# Altium PCB Sampler.PCBDOC (part 2 of 11)
Units mm, origin at the board's own origin, x right, y up, seen from the top; angles counter-clockwise.
Board outline 222.9 x 100 mm, 4 copper layers (L1, P2, L3, L4), stack 1.6 mm thick; 754 components, 442 nets, 2347 pads, 1230 vias.
Unrouted connection lines stored in the file: 10.
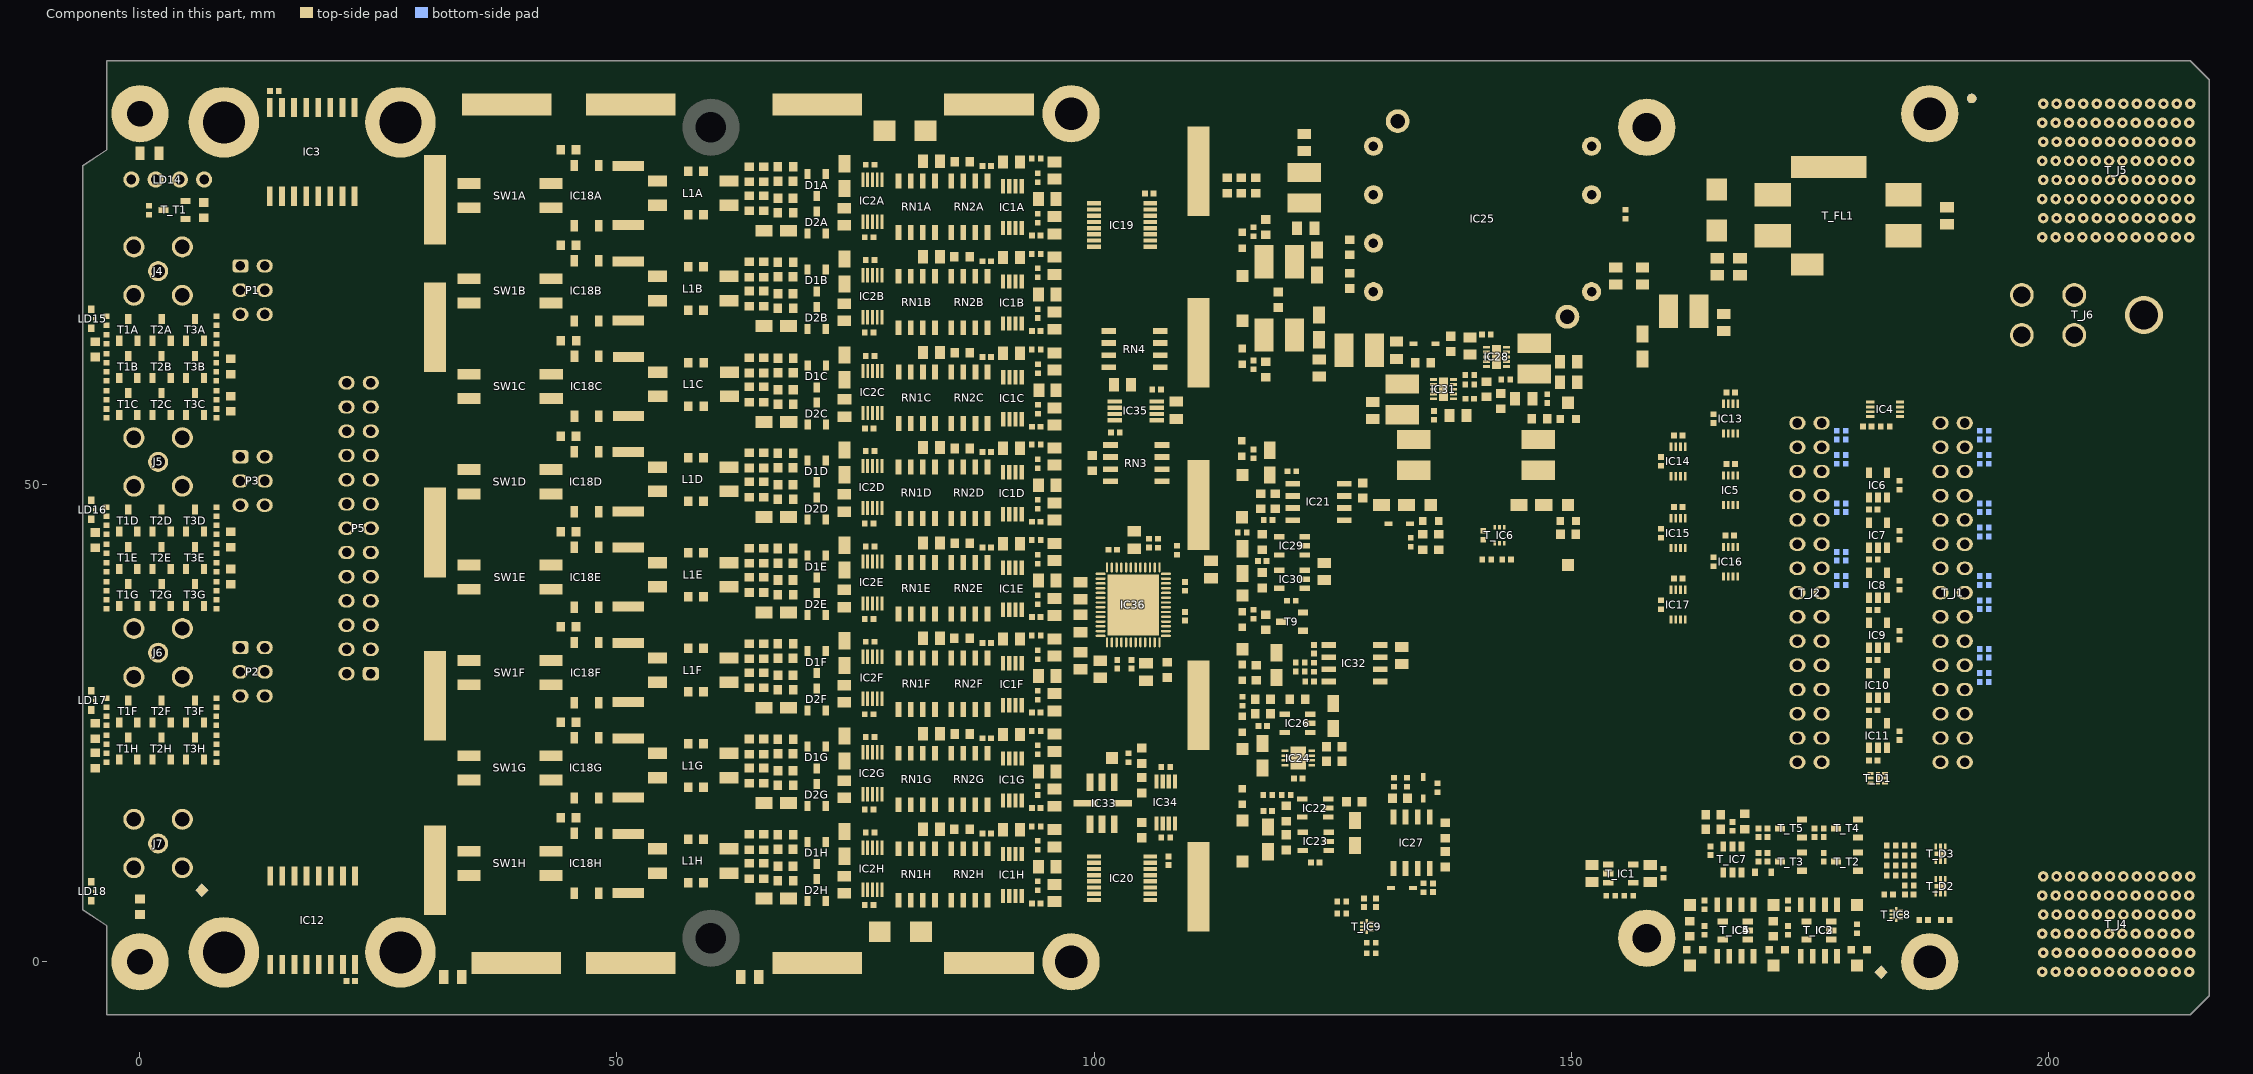
[diagram p4: the components of this part, seen from the top]

## Components (designator, comment, footprint, x,y, rotation, side; value= is the part's Value field where it differs from the comment) (continued)
IC18C "TLP170AM" TOSHIBA_11-4M1S 46.813,60.32 r270 top (schematic designator IC18)
IC18D "TLP170AM" TOSHIBA_11-4M1S 46.8,50.32 r270 top (schematic designator IC18)
IC18E "TLP170AM" TOSHIBA_11-4M1S 46.8,40.32 r270 top (schematic designator IC18)
IC18F "TLP170AM" TOSHIBA_11-4M1S 46.8,30.32 r270 top (schematic designator IC18)
IC18G "TLP170AM" TOSHIBA_11-4M1S 46.8,20.32 r270 top (schematic designator IC18)
IC18H "TLP170AM" TOSHIBA_11-4M1S 46.8,10.32 r270 top (schematic designator IC18)
IC19 "SN74LV595APWR" SOP65P640X120-16N 102.949,77.225 r0 top
IC20 "SN74LV595APWR" SOP65P640X120-16N 102.949,8.762 r0 top
IC21 "LT1763CS8#PBF" SOIC127P600X175-8N 123.534,48.203 r0 top
IC22 "LT1761ES5-SD#TRMPBF" SOT95P280X100-5N 123.194,16.119 r180 top
IC23 "LT1761ES5-BYP#TRMPBF" SOT95P280X100-5N 123.244,12.619 r180 top
IC24 "LT1964EDD#PBF" LT-DD-8_V 121.412,21.36 r0 top
IC25 "CC6-1212DF-E" CC6-1212DF-E 149.614,67.615 r180 top
IC26 "LT1964ES5-SD#TRMPBF" SOT95P280X100-5N 121.337,24.997 r180 top
IC27 "LM393AD" SOIC127P600X175-8N 133.286,12.492 r270 top
IC28 "TPS62175DQC" SON50P200X300X80-11N-R94X250 142.192,63.415 r0 top
IC29 "LT1761ES5-SD#TRMPBF" SOT95P280X100-5N 120.75,43.6 r180 top
IC30 "LT1761ES5-BYP#TRMPBF" SOT95P280X100-5N 120.75,40.1 r180 top
IC31 "TPS62175DQC" SON50P200X300X80-11N-R94X250 136.641,60.02 r180 top
IC32 "LT1763CS8#PBF" SOIC127P600X175-8N 127.296,31.294 r0 top
IC33 "LTC6655CHLS8-4.096" LCCS127P500X500X145-8N 100.844,16.634 r90 top
IC34 "LTC6655BHMS8-4.096#PBF" SOP65P490X110-8N 107.519,16.705 r90 top
IC35 "OPA2197IDGKR" SOP65P490X110-8N 104.375,57.75 r0 top
IC36 "LTC2320HUKG-16#PBF" QFN50P700X800X80_HS-53M 104.114,37.415 r0 top
J4 "SMA" DELOCK_65848 1.9,72.4 r180 top locked
J5 "SMA" DELOCK_65848 1.9,52.4 r180 top locked
J6 "SMA" DELOCK_65848 1.9,32.4 r180 top locked
J7 "SMA" DELOCK_65848 1.9,12.4 r180 top locked
L1A "2x6.5mH" IND_WURTH_WE-SL2 58.01,80.574 r0 top (schematic designator L1)
L1B "2x6.5mH" IND_WURTH_WE-SL2 58.01,70.574 r0 top (schematic designator L1)
L1C "2x6.5mH" IND_WURTH_WE-SL2 58.023,60.53 r0 top (schematic designator L1)
L1D "2x6.5mH" IND_WURTH_WE-SL2 58.01,50.574 r0 top (schematic designator L1)
L1E "2x6.5mH" IND_WURTH_WE-SL2 58.01,40.574 r0 top (schematic designator L1)
L1F "2x6.5mH" IND_WURTH_WE-SL2 58.01,30.574 r0 top (schematic designator L1)
L1G "2x6.5mH" IND_WURTH_WE-SL2 58.01,20.574 r0 top (schematic designator L1)
L1H "2x6.5mH" IND_WURTH_WE-SL2 58.01,10.574 r0 top (schematic designator L1)
L2 "10uH" IND_MURATA-PS_8400 122.044,81.13 r270 top
L3 "10uH" IND_MURATA-PS_8400 119.4,73.4 r180 top
L4 "10uH" IND_MURATA-PS_8400 161.8,68.2 r180 top
L5 "10uH" IND_MURATA-PS_8400 127.8,64.1 r180 top
L6 "10uH" IND_MURATA-PS_8400 119.4,65.7 r180 top
L7 "10uH" IND_MURATA-PS_8400 146.165,63.235 r270 top
L8 "10uH" IND_MURATA-PS_8400 146.571,53.129 r270 top
L9 "10uH" IND_MURATA-PS_8400 132.313,58.945 r270 top
L10 "10uH" IND_MURATA-PS_8400 133.5,53.129 r270 top
LD1 "Green" LED_KINGBRIGHT_KPH-1608CGCK 115.55,75.64 r90 top
LD2 "Green" LED_KINGBRIGHT_KPH-1608CGCK 180.2,1.271 r180 top
LD3 "Green" LED_KINGBRIGHT_KPH-1608CGCK 115.5,53.8 r270 top
LD4 "Green" LED_KINGBRIGHT_KPH-1608CGCK 115.55,17.325 r270 top
LD5 "Green" LED_KINGBRIGHT_KPH-1608CGCK 135.3,46.2 r0 top
LD6 "Green" LED_KINGBRIGHT_KPH-1608CGCK 115.55,30.338 r90 top
LD7 "Green" LED_KINGBRIGHT_KPH-1608CGCK 149.7,56.897 r180 top
LD8 "Green" LED_KINGBRIGHT_KPH-1608CGCK 149.7,46.2 r0 top
LD9 "Green" LED_KINGBRIGHT_KPH-1608CGCK 171.6,1.271 r180 top
LD10 "Green" LED_KINGBRIGHT_KPH-1608CGCK 162.975,1.271 r180 top
LD11 "Green" LED_KINGBRIGHT_KPH-1608CGCK 115.55,35.875 r90 top
LD12 "Green" LED_KINGBRIGHT_KPH-1608CGCK 115.55,24.9 r90 top
LD13 "Green" LED_KINGBRIGHT_KPH-1608CGCK 115.55,63.46 r270 top
LD14 "Red/Green" LED_DIALIGHT_571-0112F -0.9,82 r0 top locked
LD15 "Green" LED_AVAGO_HSME-C120 -5.1,67.4 r90 top locked
LD16 "Green" LED_AVAGO_HSME-C120 -5.1,47.4 r90 top locked
LD17 "Green" LED_AVAGO_HSME-C120 -5.1,27.4 r90 top locked
LD18 "Green" LED_AVAGO_HSME-C120 -5.1,7.4 r90 top locked
M1 "Plated Hole" MTG300_600 157.944,2.48 r0 top
M2 "Plated Hole" MTG300_600 157.944,87.48 r180 top
P1 "61300621121" 61300621121 11.8,70.4 r270 top locked
P2 "61300621121" 61300621121 11.8,30.4 r270 top locked
P3 "61300621121" 61300621121 11.8,50.4 r270 top locked
P5 "61302621121" 61302621121 22.93,45.45 r90 top locked
R1A "Undefined" RESC1608X55N 58.264,82.86 r0 top (schematic designator R1)
R1B "Undefined" RESC1608X55N 58.264,72.86 r0 top (schematic designator R1)
R1C "Undefined" RESC1608X55N 58.277,62.816 r0 top (schematic designator R1)
R1D "Undefined" RESC1608X55N 58.264,52.86 r0 top (schematic designator R1)
R1E "Undefined" RESC1608X55N 58.264,42.86 r0 top (schematic designator R1)
R1F "Undefined" RESC1608X55N 58.264,32.86 r0 top (schematic designator R1)
R1G "Undefined" RESC1608X55N 58.264,22.86 r0 top (schematic designator R1)
R1H "Undefined" RESC1608X55N 58.264,12.86 r0 top (schematic designator R1)
R2A "0" RESC1608X55N 63.852,82.56 r90 top (schematic designator R2)
R2B "0" RESC1608X55N 63.852,72.56 r90 top (schematic designator R2)
R2C "0" RESC1608X55N 63.865,62.516 r90 top (schematic designator R2)
R2D "0" RESC1608X55N 63.852,52.56 r90 top (schematic designator R2)
R2E "0" RESC1608X55N 63.852,42.56 r90 top (schematic designator R2)
R2F "0" RESC1608X55N 63.852,32.56 r90 top (schematic designator R2)
R2G "0" RESC1608X55N 63.852,22.56 r90 top (schematic designator R2)
R2H "0" RESC1608X55N 63.852,12.56 r90 top (schematic designator R2)
R3A "1k8" RESC1608X55N 67.662,83.322 r0 top (schematic designator R3)
R3B "1k8" RESC1608X55N 67.662,73.322 r0 top (schematic designator R3)
R3C "1k8" RESC1608X55N 67.675,63.278 r0 top (schematic designator R3)
R3D "1k8" RESC1608X55N 67.662,53.322 r0 top (schematic designator R3)
R3E "1k8" RESC1608X55N 67.662,43.322 r0 top (schematic designator R3)
R3F "1k8" RESC1608X55N 67.662,33.322 r0 top (schematic designator R3)
R3G "1k8" RESC1608X55N 67.662,23.322 r0 top (schematic designator R3)
R3H "1k8" RESC1608X55N 67.662,13.322 r0 top (schematic designator R3)
R4A "100k" RESC1608X55N 65.376,82.56 r90 top (schematic designator R4)
R4B "100k" RESC1608X55N 65.376,72.56 r90 top (schematic designator R4)
R4C "100k" RESC1608X55N 65.389,62.516 r90 top (schematic designator R4)
R4D "100k" RESC1608X55N 65.376,52.56 r90 top (schematic designator R4)
R4E "100k" RESC1608X55N 65.376,42.56 r90 top (schematic designator R4)
R4F "100k" RESC1608X55N 65.376,32.56 r90 top (schematic designator R4)
R4G "100k" RESC1608X55N 65.376,22.56 r90 top (schematic designator R4)
R4H "100k" RESC1608X55N 65.376,12.56 r90 top (schematic designator R4)
R5A "49R9" RESC6331X70N 51.194,80.32 r90 top (schematic designator R5)
R5B "49R9" RESC6331X70N 51.194,70.32 r90 top (schematic designator R5)
R5C "49R9" RESC6331X70N 51.207,60.32 r90 top (schematic designator R5)
R5D "49R9" RESC6331X70N 51.194,50.32 r90 top (schematic designator R5)
R5E "49R9" RESC6331X70N 51.194,40.32 r90 top (schematic designator R5)
R5F "49R9" RESC6331X70N 51.194,30.32 r90 top (schematic designator R5)
R5G "49R9" RESC6331X70N 51.194,20.32 r90 top (schematic designator R5)
R5H "49R9" RESC6331X70N 51.194,10.32 r90 top (schematic designator R5)
R6A "51" RESC1005X40N 94.103,77.956 r90 top (schematic designator R6)
R6B "51" RESC1005X40N 94.103,67.956 r90 top (schematic designator R6)
R6C "51" RESC1005X40N 94.116,57.912 r90 top (schematic designator R6)
R6D "51" RESC1005X40N 94.103,47.956 r90 top (schematic designator R6)
R6E "51" RESC1005X40N 94.103,37.956 r90 top (schematic designator R6)
R6F "51" RESC1005X40N 94.103,27.956 r90 top (schematic designator R6)
R6G "51" RESC1005X40N 94.103,17.956 r90 top (schematic designator R6)
R6H "51" RESC1005X40N 94.103,7.956 r90 top (schematic designator R6)
R7A "24k" RESC1608X55N 86.194,83.88 r180 top (schematic designator R7)
R7B "24k" RESC1608X55N 86.169,73.905 r180 top (schematic designator R7)
R7C "24k" RESC1608X55N 86.194,63.855 r180 top (schematic designator R7)
R7D "24k" RESC1608X55N 86.194,53.805 r180 top (schematic designator R7)
R7E "24k" RESC1608X55N 86.194,43.88 r180 top (schematic designator R7)
R7F "24k" RESC1608X55N 86.169,33.905 r180 top (schematic designator R7)
R7G "24k" RESC1608X55N 86.194,23.88 r180 top (schematic designator R7)
R7H "24k" RESC1608X55N 86.169,13.88 r180 top (schematic designator R7)
R8A "Undefined" RESC1608X55N 58.264,78.288 r0 top (schematic designator R8)
R8B "Undefined" RESC1608X55N 58.264,68.288 r0 top (schematic designator R8)
R8C "Undefined" RESC1608X55N 58.277,58.244 r0 top (schematic designator R8)
R8D "Undefined" RESC1608X55N 58.264,48.288 r0 top (schematic designator R8)
R8E "Undefined" RESC1608X55N 58.264,38.288 r0 top (schematic designator R8)
R8F "Undefined" RESC1608X55N 58.264,28.288 r0 top (schematic designator R8)
R8G "Undefined" RESC1608X55N 58.264,18.288 r0 top (schematic designator R8)
R8H "Undefined" RESC1608X55N 58.264,8.288 r0 top (schematic designator R8)
R9A "0" RESC1608X55N 63.852,79.512 r270 top (schematic designator R9)
R9B "0" RESC1608X55N 63.852,69.512 r270 top (schematic designator R9)
R9C "0" RESC1608X55N 63.865,59.468 r270 top (schematic designator R9)
R9D "0" RESC1608X55N 63.852,49.512 r270 top (schematic designator R9)
R9E "0" RESC1608X55N 63.852,39.512 r270 top (schematic designator R9)
R9F "0" RESC1608X55N 63.852,29.512 r270 top (schematic designator R9)
R9G "0" RESC1608X55N 63.852,19.512 r270 top (schematic designator R9)
R9H "0" RESC1608X55N 63.852,9.512 r270 top (schematic designator R9)
R10A "1k8" RESC1608X55N 67.662,78.496 r0 top (schematic designator R10)
R10B "1k8" RESC1608X55N 67.662,68.496 r0 top (schematic designator R10)
R10C "1k8" RESC1608X55N 67.675,58.452 r0 top (schematic designator R10)
R10D "1k8" RESC1608X55N 67.662,48.496 r0 top (schematic designator R10)
R10E "1k8" RESC1608X55N 67.662,38.496 r0 top (schematic designator R10)
R10F "1k8" RESC1608X55N 67.662,28.496 r0 top (schematic designator R10)
R10G "1k8" RESC1608X55N 67.662,18.496 r0 top (schematic designator R10)
R10H "1k8" RESC1608X55N 67.662,8.496 r0 top (schematic designator R10)
R11A "100k" RESC1608X55N 65.376,79.512 r270 top (schematic designator R11)
R11B "100k" RESC1608X55N 65.376,69.512 r270 top (schematic designator R11)
R11C "100k" RESC1608X55N 65.389,59.468 r270 top (schematic designator R11)
R11D "100k" RESC1608X55N 65.376,49.512 r270 top (schematic designator R11)
R11E "100k" RESC1608X55N 65.376,39.512 r270 top (schematic designator R11)
R11F "100k" RESC1608X55N 65.376,29.512 r270 top (schematic designator R11)
R11G "100k" RESC1608X55N 65.376,19.512 r270 top (schematic designator R11)
R11H "100k" RESC1608X55N 65.376,9.512 r270 top (schematic designator R11)
R12A "51" RESC1005X40N 94.103,82.206 r270 top (schematic designator R12)
R12B "51" RESC1005X40N 94.103,72.206 r270 top (schematic designator R12)
R12C "51" RESC1005X40N 94.116,62.162 r270 top (schematic designator R12)
R12D "51" RESC1005X40N 94.103,52.206 r270 top (schematic designator R12)
R12E "51" RESC1005X40N 94.103,42.206 r270 top (schematic designator R12)
R12F "51" RESC1005X40N 94.103,32.206 r270 top (schematic designator R12)
R12G "51" RESC1005X40N 94.103,22.206 r270 top (schematic designator R12)
R12H "51" RESC1005X40N 94.103,12.206 r270 top (schematic designator R12)
R13A "2k4" RESC1005X40N 93.944,84.205 r180 top (schematic designator R13)
R13B "2k4" RESC1005X40N 93.944,74.205 r180 top (schematic designator R13)
R13C "2k4" RESC1005X40N 93.957,64.161 r180 top (schematic designator R13)
R13D "2k4" RESC1005X40N 93.944,54.205 r180 top (schematic designator R13)
R13E "2k4" RESC1005X40N 93.944,44.205 r180 top (schematic designator R13)
R13F "2k4" RESC1005X40N 93.944,34.205 r180 top (schematic designator R13)
R13G "2k4" RESC1005X40N 93.944,24.205 r180 top (schematic designator R13)
R13H "2k4" RESC1005X40N 93.944,14.205 r180 top (schematic designator R13)
R14 "100" RESC1005X40N 182.917,56.114 r180 top
R15 "100" RESC1005X40N 184.427,49.97 r270 top
R16 "100" RESC1005X40N 184.427,44.72 r270 top
R17 "100" RESC1005X40N 184.427,39.47 r270 top
R18 "100" RESC1005X40N 184.427,34.22 r270 top
R19 "100" RESC1005X40N 184.427,23.72 r270 top
R20 "100" RESC1005X40N 164.938,56.948 r90 top
R21 "100" RESC1005X40N 159.427,52.444 r90 top
R22 "100" RESC1005X40N 159.427,44.944 r90 top
R23 "100" RESC1005X40N 164.927,41.945 r90 top
R24 "100" RESC1005X40N 159.427,37.445 r90 top
R25A "1k2" RESC1608X55N 44.9,85.1 r180 top (schematic designator R25)
R25B "1k2" RESC1608X55N 44.9,75.1 r180 top (schematic designator R25)
R25C "1k2" RESC1608X55N 44.913,65.1 r180 top (schematic designator R25)
R25D "1k2" RESC1608X55N 44.9,55.1 r180 top (schematic designator R25)
R25E "1k2" RESC1608X55N 44.9,45.1 r180 top (schematic designator R25)
R25F "1k2" RESC1608X55N 44.9,35.1 r180 top (schematic designator R25)
R25G "1k2" RESC1608X55N 44.9,25.1 r180 top (schematic designator R25)
R25H "1k2" RESC1608X55N 44.9,15.1 r180 top (schematic designator R25)
R26 "1k2" RESC1608X55N 9.5,62.4 r90 top
R27A "10k" RESC1005X40N -3.5,67.175 r270 top (schematic designator R27)
R27B "10k" RESC1005X40N -3.5,63.275 r270 top (schematic designator R27)
R27C "10k" RESC1005X40N -3.497,59.375 r270 top (schematic designator R27)
R27D "10k" RESC1005X40N -3.5,47.175 r270 top (schematic designator R27)
R27E "10k" RESC1005X40N -3.5,43.275 r270 top (schematic designator R27)
R27F "10k" RESC1005X40N -3.5,27.175 r270 top (schematic designator R27)
R27G "10k" RESC1005X40N -3.5,39.375 r270 top (schematic designator R27)
R27H "10k" RESC1005X40N -3.497,23.275 r270 top (schematic designator R27)
R28 "1k2" RESC1608X55N -4.7,64.2 r270 top
R29A "10k" RESC1005X40N -3.5,65.275 r90 top (schematic designator R29)
R29B "10k" RESC1005X40N -3.5,61.375 r90 top (schematic designator R29)
R29C "10k" RESC1005X40N -3.5,57.475 r90 top (schematic designator R29)
R29D "10k" RESC1005X40N -3.5,45.275 r90 top (schematic designator R29)
R29E "10k" RESC1005X40N -3.5,41.375 r90 top (schematic designator R29)
R29F "10k" RESC1005X40N -3.5,25.275 r90 top (schematic designator R29)
R29G "10k" RESC1005X40N -3.5,37.475 r90 top (schematic designator R29)
R29H "10k" RESC1005X40N -3.5,21.375 r90 top (schematic designator R29)
R30 "1k2" RESC1608X55N 9.5,58.5 r90 top
R31A "10k" RESC1005X40N 8,65.275 r270 top (schematic designator R31)
R31B "10k" RESC1005X40N 7.997,61.375 r270 top (schematic designator R31)
R31C "10k" RESC1005X40N 8,57.475 r270 top (schematic designator R31)
R31D "10k" RESC1005X40N 8,45.275 r270 top (schematic designator R31)
R31E "10k" RESC1005X40N 8,41.375 r270 top (schematic designator R31)
R31F "10k" RESC1005X40N 7.997,25.275 r270 top (schematic designator R31)
R31G "10k" RESC1005X40N 8,37.475 r270 top (schematic designator R31)
R31H "10k" RESC1005X40N 8,21.375 r270 top (schematic designator R31)
R32 "1k2" RESC1608X55N -4.7,44.2 r270 top
R33A "10k" RESC1005X40N 8,67.175 r270 top (schematic designator R33)
R33B "10k" RESC1005X40N 7.997,63.275 r270 top (schematic designator R33)
R33C "10k" RESC1005X40N 8,59.375 r270 top (schematic designator R33)
R33D "10k" RESC1005X40N 8,47.175 r270 top (schematic designator R33)
R33E "10k" RESC1005X40N 8,43.275 r270 top (schematic designator R33)
R33F "10k" RESC1005X40N 8,27.175 r270 top (schematic designator R33)
R33G "10k" RESC1005X40N 8,39.375 r270 top (schematic designator R33)
R33H "10k" RESC1005X40N 8,23.275 r270 top (schematic designator R33)
R34 "1k2" RESC1608X55N 9.5,44.272 r270 top
R35 "10k" RESC1005X40N 121.63,30.424 r0 top
R37 "1k2" RESC1608X55N -4.7,24.2 r270 top
R38 "1k2" RESC1608X55N 9.5,40.372 r270 top
R40 "1k2" RESC1608X55N -4.7,21.1 r90 top
R41 "Undefined" RESC1608X55N 113.944,81.38 r270 top
R42 "Undefined" RESC1608X55N 116.944,81.38 r270 top
R45 "10k" RESC1005X40N 116.721,76.54 r90 top
R46 "1k2" RESC1608X55N 118,77.01 r270 top
R47 "10k" RESC1005X40N 179.977,3.471 r90 top
R48 "10k" RESC1005X40N 116.7,53.23 r270 top
R49 "5k1" RESC1005X40N 118.2,17.5 r0 top
R50 "2k7" RESC1608X55N 136.125,44 r270 top
R51 "24k" RESC1608X55N 117.493,48.269 r270 top
R52 "2k7" RESC1608X55N 118.993,48.269 r90 top
R53 "2k7" RESC1608X55N 121.337,27.5 r0 top
R54 "24k" RESC1608X55N 120.144,15.55 r270 top
R55 "5k1" RESC1005X40N 120.144,17.5 r0 top
R56 "Undefined" RESC1608X55N 126.813,71.38 r270 top
R57 "0" RESC1005X40N 155.694,78.38 r90 top
R58 "36k" RESC1608X55N 126.813,74.899 r270 top
R59 "10k" RESC1005X40N 131.425,18.82 r90 top
R60 "2k4" RESC1005X40N 136.011,18.242 r90 top
R61 "24k" RESC1608X55N 117.7,26.025 r180 top
R62 "62k" RESC1005X40N 132.825,18.82 r270 top
R63 "2k7" RESC1608X55N 117.7,27.5 r0 top
R64 "24k" RESC1608X55N 134.491,62.795 r180 top
R65 "5k1" RESC1005X40N 134.536,7.742 r270 top
R66 "270k" RESC1608X55N 142.641,58.77 r270 top
R67 "24k" RESC1608X55N 136.825,13.767 r90 top
R68 "82k" RESC1608X55N 141.141,60.02 r90 top
R69 "5k1" RESC1005X40N 143.141,61.02 r180 top
R70 "36k" RESC1608X55N 117.65,44 r270 top
R71 "33k" RESC1005X40N 115.55,45 r0 top
R72 "33k" RESC1005X40N 139.391,60.52 r0 top
R73 "62k" RESC1005X40N 121.63,31.364 r180 top
R74 "5k1" RESC1005X40N 139.391,61.52 r180 top
R75 "10k" RESC1005X40N 123.046,30.894 r90 top
R76 "1k" RESC1608X55N 118,35.6 r270 top
R77 "82k" RESC1608X55N 107.694,30.605 r90 top
R78 "0" RESC1005X40N 106.687,43.891 r90 top
R79 "100" RESC1005X40N 108.694,43.13 r270 top
R80 "0" RESC1005X40N 107.521,13.013 r180 top
R81 "0" RESC1005X40N 103.6,21.4 r90 top
R82 "0" RESC1005X40N 107.521,20.409 r180 top
R83 "24k" RESC1608X55N 99.8,52.275 r270 top
R84 "1k2" RESC1608X55N 134.475,44 r90 top
R85 "2k7" RESC1608X55N 117,30.3 r90 top
R86 "Undefined" RESC1608X55N 115.444,81.38 r270 top
R87 "1k2" RESC1608X55N 146.7,56.9 r180 top
R88 "1k2" RESC1608X55N 149.7,44.8 r180 top
R89 "1k2" RESC1608X55N 171.221,3.471 r90 top
R90 "1k2" RESC1608X55N 162.465,3.471 r90 top
R91 "470" RESC1005X40N 116.7,36.42 r270 top
R92 "10k" RESC1005X40N 115.55,27.3 r90 top
R93 "10k" RESC1005X40N 116.721,62.56 r270 top
R94 "1k2" RESC1608X55N 118,62.09 r90 top
R157 "0" RESC1005X40N 133.2,43.97 r270 top
RN1A "10k 5K 5K 10K" SOIC127P600X175-8N 81.423,79.157 r90 top (schematic designator RN1)
RN1B "10k 5K 5K 10K" SOIC127P600X175-8N 81.423,69.157 r90 top (schematic designator RN1)
RN1C "10k 5K 5K 10K" SOIC127P600X175-8N 81.436,59.113 r90 top (schematic designator RN1)
RN1D "10k 5K 5K 10K" SOIC127P600X175-8N 81.423,49.157 r90 top (schematic designator RN1)
RN1E "10k 5K 5K 10K" SOIC127P600X175-8N 81.423,39.157 r90 top (schematic designator RN1)
RN1F "10k 5K 5K 10K" SOIC127P600X175-8N 81.423,29.157 r90 top (schematic designator RN1)
RN1G "10k 5K 5K 10K" SOIC127P600X175-8N 81.423,19.157 r90 top (schematic designator RN1)
RN1H "10k 5K 5K 10K" SOIC127P600X175-8N 81.423,9.157 r90 top (schematic designator RN1)
RN2A "10k 5K 5K 10K" SOIC127P600X175-8N 86.929,79.155 r270 top (schematic designator RN2)
RN2B "10k 5K 5K 10K" SOIC127P600X175-8N 86.929,69.155 r270 top (schematic designator RN2)
RN2C "10k 5K 5K 10K" SOIC127P600X175-8N 86.942,59.112 r270 top (schematic designator RN2)
RN2D "10k 5K 5K 10K" SOIC127P600X175-8N 86.929,49.155 r270 top (schematic designator RN2)
RN2E "10k 5K 5K 10K" SOIC127P600X175-8N 86.929,39.155 r270 top (schematic designator RN2)
RN2F "10k 5K 5K 10K" SOIC127P600X175-8N 86.929,29.155 r270 top (schematic designator RN2)
RN2G "10k 5K 5K 10K" SOIC127P600X175-8N 86.929,19.155 r270 top (schematic designator RN2)
RN2H "10k 5K 5K 10K" SOIC127P600X175-8N 86.929,9.155 r270 top (schematic designator RN2)
RN3 "10k 5K 5K 10K" SOIC127P600X175-8N 104.425,52.275 r0 top
RN4 "10k 5K 5K 10K" SOIC127P600X175-8N 104.25,64.225 r0 top
ST1 "M3 x 12mm" 9774120360 8.8,1 r0 top locked
ST2 "M3 x 12mm" 9774120360 8.8,88 r0 top locked
ST3 "M3 x 12mm" 9774120360 27.3,1 r0 top locked
ST4 "M3 x 12mm" 9774120360 27.3,88 r0 top locked
SW1A "Switch" SW_CTS_204-121ST 38.786,80.32 r0 top (schematic designator SW1)
SW1B "Switch" SW_CTS_204-121ST 38.786,70.32 r0 top (schematic designator SW1)
SW1C "Switch" SW_CTS_204-121ST 38.799,60.32 r0 top (schematic designator SW1)
SW1D "Switch" SW_CTS_204-121ST 38.786,50.32 r0 top (schematic designator SW1)
SW1E "Switch" SW_CTS_204-121ST 38.786,40.32 r0 top (schematic designator SW1)
SW1F "Switch" SW_CTS_204-121ST 38.786,30.32 r0 top (schematic designator SW1)
SW1G "Switch" SW_CTS_204-121ST 38.786,20.32 r0 top (schematic designator SW1)
SW1H "Switch" SW_CTS_204-121ST 38.786,10.32 r0 top (schematic designator SW1)
T1A "BSS138LT1G" SOT95P240X110-3N -1.225,66.25 r90 top (schematic designator T1)
T1B "BSS138LT1G" SOT95P240X110-3N -1.233,62.35 r90 top (schematic designator T1)
T1C "BSS138LT1G" SOT95P240X110-3N -1.23,58.45 r90 top (schematic designator T1)
T1D "BSS138LT1G" SOT95P240X110-3N -1.233,46.25 r90 top (schematic designator T1)
T1E "BSS138LT1G" SOT95P240X110-3N -1.23,42.35 r90 top (schematic designator T1)
T1F "BSS138LT1G" SOT95P240X110-3N -1.233,26.25 r90 top (schematic designator T1)
T1G "BSS138LT1G" SOT95P240X110-3N -1.225,38.45 r90 top (schematic designator T1)
T1H "BSS138LT1G" SOT95P240X110-3N -1.23,22.35 r90 top (schematic designator T1)
T2A "BSS138LT1G" SOT95P240X110-3N 2.275,66.25 r90 top (schematic designator T2)
T2B "BSS138LT1G" SOT95P240X110-3N 2.267,62.35 r90 top (schematic designator T2)
T2C "BSS138LT1G" SOT95P240X110-3N 2.27,58.45 r90 top (schematic designator T2)
T2D "BSS138LT1G" SOT95P240X110-3N 2.267,46.25 r90 top (schematic designator T2)
T2E "BSS138LT1G" SOT95P240X110-3N 2.27,42.35 r90 top (schematic designator T2)
T2F "BSS138LT1G" SOT95P240X110-3N 2.267,26.25 r90 top (schematic designator T2)
T2G "BSS138LT1G" SOT95P240X110-3N 2.275,38.45 r90 top (schematic designator T2)
T2H "BSS138LT1G" SOT95P240X110-3N 2.27,22.35 r90 top (schematic designator T2)
T3A "BSS138LT1G" SOT95P240X110-3N 5.775,66.25 r90 top (schematic designator T3)
T3B "BSS138LT1G" SOT95P240X110-3N 5.767,62.35 r90 top (schematic designator T3)
T3C "BSS138LT1G" SOT95P240X110-3N 5.77,58.45 r90 top (schematic designator T3)
T3D "BSS138LT1G" SOT95P240X110-3N 5.767,46.25 r90 top (schematic designator T3)
T3E "BSS138LT1G" SOT95P240X110-3N 5.77,42.35 r90 top (schematic designator T3)
T3F "BSS138LT1G" SOT95P240X110-3N 5.767,26.25 r90 top (schematic designator T3)
T3G "BSS138LT1G" SOT95P240X110-3N 5.775,38.45 r90 top (schematic designator T3)
T3H "BSS138LT1G" SOT95P240X110-3N 5.77,22.35 r90 top (schematic designator T3)
T9 "BSS138LT1G" SOT95P240X110-3N 120.75,35.65 r180 top
T_B1 "Plated Hole" c600h270 0,0 r0 top
T_B2 "Plated Hole" c600h270 0,88.9 r0 top locked
T_C1 "4.7uF" CAPC2012X135N 152.2,9.25 r90 top
T_C2 "4.7uF" CAPC2012X135N 158.3,9.25 r90 top
T_C3 "100nF" CAPC1005X55N 172.753,3.284 r90 top
T_C4 "100nF" CAPC1005X55N 172.753,5.963 r270 top
T_C5 "100nF" CAPC1005X55N 163.997,3.284 r90 top
T_C6 "100nF" CAPC1005X55N 163.997,5.963 r270 top
T_C8 "100nF" CAPC1005X55N 143.24,42.184 r180 top
T_C9 "10uF" CAPC2012X95N 167.73,72.85 r90 top
T_C10 "10uF" CAPC2012X95N 165.33,72.85 r90 top
T_C11 "10uF" CAPC2012X95N 189.4,78.2 r270 top
T_C12 "18pF" CAPC1608X87N 0,5.775 r270 top
T_C13 "10nF" CAPC1005X55N 166.919,14.186 r90 top
T_C14 "100nF" CAPC1005X55N 175.542,13.527 r270 top
T_C15 "100nF" CAPC1005X55N 170.609,13.527 r270 top
T_C16 "10nF" CAPC1005X55N 169.658,13.527 r270 top
T_C17 "10nF" CAPC1005X55N 176.493,10.95 r90 top
T_C18 "10nF" CAPC1005X55N 169.658,10.95 r90 top
T_C19 "10nF" CAPC1005X55N 170.609,10.95 r90 top
T_C20 "100nF" CAPC1005X55N 164.62,11.636 r90 top
T_C21 "100nF" CAPC1005X55N 176.493,13.527 r90 top
T_C22 "100nF" CAPC1005X55N 183.28,7.042 r0 top
T_C23 "100nF" CAPC1005X55N 185.45,7.042 r180 top
T_C24 "100nF" CAPC1005X55N 129.55,6.196 r270 top
T_C25 "100nF" CAPC1005X55N 128.3,6.196 r270 top
T_D1 "UCLAMP3305P.TCT" SON50P160X65_HS-7N 182.177,19.25 r180 top
T_D2 "UCLAMP3305P.TCT" SON50P160X65_HS-7N 188.731,7.933 r90 top
T_D3 "UCLAMP3305P.TCT" SON50P160X65_HS-7N 188.731,11.332 r90 top
T_D5 "SMBJ12A" DIOM5336X265N 165.3,78.8 r90 top
T_D6 "CDBU0520-HF" SOD-523F 170.126,9.391 r180 top
T_FL1 "10A/50VDC" FIL_MURATA_BNX02 178,78.2 r180 top
T_IC1 "MIC5219-3.3YM5" SOT95P280X145-5N 155.225,9.25 r0 top
T_IC2 "24AA02E48T-I/OT" SOT95P280X145-5N 175.983,3.284 r180 top
T_IC3 "24AA025E48-I/SN" SOIC127P600X175-8N 175.983,3.284 r90 top
T_IC4 "24AA02E48T-I/OT" SOT95P280X145-5N 167.228,3.284 r180 top
T_IC5 "24AA025E48-I/SN" SOIC127P600X175-8N 167.228,3.284 r90 top
T_IC6 "TMP112DQDRLRQ1" SOTFL50P160X60-6N 142.5,44.7 r270 top
T_IC7 "TPS3808G01DBVT" SOT95P280X145-6N 166.919,10.736 r90 top
T_IC8 "FXMA2102UMX" FXMA2102UMX 184.091,4.958 r270 top
T_IC9 "FXMA2102UMX" FXMA2102UMX 128.6,3.7 r270 top
T_J1 "" 3M_N2530-6002RB 190,38.7 r270 top locked
T_J2 "" 3M_N2530-6002RB 175,38.7 r270 top locked
T_J4 "P1" AMPHENOL_10052825-101LF 207.15,3.95 r90 top locked
T_J5 "P6" AMPHENOL_10052838-101LF 207.15,82.95 r90 top locked
T_J6 "Mini-Fit Jr.™" MOLEX_39-30-0040 200,67.8 r270 top
T_M1 "PTH_3.4X6_BTKO" PTH-M3.4x6.0_BTKO 97.6,88.9 r180 top locked
T_M2 "PTH_3.4X6_BTKO" PTH-M3.4x6.0_BTKO 187.6,88.9 r180 top
T_M3 "PTH_3.4X6_BTKO" PTH-M3.4x6.0_BTKO 97.6,0 r0 top locked
T_M4 "PTH_3.4X6_BTKO" PTH-M3.4x6.0_BTKO 187.6,0 r0 top locked
T_R1 "1k8" RESC1608X55N 6.675,78.794 r270 top
T_R2 "0" RESC1005X40N 159.7,9.277 r270 top
T_R3 "10k" RESC1005X40N 0.925,78.794 r270 top
T_R4 "10k" RESC1005X40N 156.05,6.925 r180 top
T_R5 "10k" RESC1005X40N 129.05,0.9 r0 top
T_R6 "10k" RESC1005X40N 129.05,2 r0 top
T_R7 "3k9" RESC1005X40N 154.15,6.925 r0 top
T_R8 "10k" RESC1005X40N 140.8,44.7 r270 top
T_R9 "1k2" RESC1608X55N 164.907,15.4 r180 top
T_R13 "22" RESC1005X40N 185.472,9.044 r0 top
T_R14 "22" RESC1005X40N 185.472,10.098 r0 top
T_R15 "22" RESC1005X40N 185.472,7.99 r0 top
T_R16 "22" RESC1005X40N 185.472,11.153 r0 top
T_R17 "22" RESC1005X40N 189.25,4.4 r0 top
T_R18 "22" RESC1005X40N 185.472,12.207 r0 top
T_R19 "200" RESC1005X40N 186.95,4.4 r180 top
T_R25 "0" RESC1005X40N 141.168,42.184 r180 top
T_R26 "1M1" RESC2012X60N 1,84.748 r0 top
T_R27 "10M" RESC2113X55N 63.914,-1.604 r0 top
T_R28 "10M" RESC2113X55N 32.774,-1.604 r0 top
T_R29 "100k" RESC1608X55N 168.2,14.7 r90 top
T_R30 "2k7" RESC1608X55N 164.907,13.9 r0 top
T_R31 "10k" RESC1005X40N 183.562,9.034 r180 top
T_R32 "10k" RESC1005X40N 183.562,10.078 r180 top
T_R33 "10k" RESC1005X40N 183.562,11.153 r180 top
T_R34 "10k" RESC1005X40N 183.562,12.207 r180 top
T_R35 "0" RESC1005X40N 193.326,55.668 r180 bottom
T_R36 "0" RESC1005X40N 193.326,53.128 r180 bottom
T_R37 "0" RESC1005X40N 193.326,48.048 r180 bottom
T_R38 "0" RESC1005X40N 193.326,45.508 r180 bottom
T_R39 "0" RESC1005X40N 193.326,40.428 r180 bottom
T_R40 "0" RESC1005X40N 193.326,37.888 r180 bottom
T_R41 "0" RESC1005X40N 193.326,32.808 r180 bottom
T_R42 "0" RESC1005X40N 193.326,30.268 r180 bottom
T_R43 "0" RESC1005X40N 178.326,55.668 r180 bottom
T_R44 "0" RESC1005X40N 178.326,53.128 r180 bottom
T_R45 "0" RESC1005X40N 178.326,48.048 r180 bottom
T_R46 "0" RESC1005X40N 178.326,42.071 r180 bottom
T_R47 "0" RESC1005X40N 178.326,40.428 r180 bottom
T_R51 "0" RESC1005X40N 193.326,54.749 r180 bottom
T_R52 "0" RESC1005X40N 193.326,52.209 r180 bottom
T_R53 "0" RESC1005X40N 193.326,47.129 r180 bottom
T_R54 "0" RESC1005X40N 193.326,44.589 r180 bottom
T_R55 "0" RESC1005X40N 193.326,39.509 r180 bottom
T_R56 "0" RESC1005X40N 193.326,36.969 r180 bottom
T_R57 "0" RESC1005X40N 193.326,31.889 r180 bottom
T_R58 "0" RESC1005X40N 193.326,29.349 r180 bottom
T_R59 "0" RESC1005X40N 178.326,54.749 r180 bottom
T_R60 "0" RESC1005X40N 178.326,52.209 r180 bottom
T_R61 "0" RESC1005X40N 178.326,47.129 r180 bottom
T_R62 "0" RESC1005X40N 178.326,42.971 r180 bottom
T_R63 "0" RESC1005X40N 178.326,39.509 r180 bottom
T_R67 "10k" RESC1005X40N 125.95,6.331 r0 top
T_R68 "10k" RESC1005X40N 125.95,5.061 r0 top
T_T1 "BSS138LT1G" SOT95P240X110-3N 3.6,78.807 r180 top
T_T2 "BSS138LT1G" SOT95P240X110-3N 178.95,10.5 r180 top
T_T3 "BSS138LT1G" SOT95P240X110-3N 173.066,10.5 r180 top
T_T4 "BSS138LT1G" SOT95P240X110-3N 178.95,13.977 r180 top
T_T5 "BSS138LT1G" SOT95P240X110-3N 173.066,13.977 r180 top
TP1 "Test Point" TPS127 115.55,71.9 r270 top
TP2 "Test Point" TPS127 179.977,5.949 r90 top
TP3 "Test Point" TPS127 149.7,41.6 r90 top
TP4 "Test Point" TPS127 171.221,-0.387 r90 top
TP5 "Test Point" TPS127 179.977,-0.387 r90 top
TP6 "Test Point" TPS127 162.465,-0.387 r90 top
TP7 "Test Point" TPS127 115.55,51.025 r0 top
TP8 "Test Point" TPS127 115.55,14.798 r0 top
TP9 "Test Point" TPS127 115.55,22.29 r180 top
TP10 "Test Point" TPS127 115.55,38.406 r180 top
TP11 "Test Point" TPS127 149.7,47.88 r90 top
TP12 "Test Point" TPS127 135.3,47.88 r90 top
TP13 "Test Point" TPS127 115.55,32.763 r0 top
TP14 "Test Point" TPS127 115.55,10.5 r90 top
TP15 "Test Point" TPS127 101.9,21.35 r90 top
TP16 "Test Point" TPS127 115.5,46.6 r90 top
TP17 "Test Point" TPS127 149.7,58.597 r180 top
TP18 "Test Point" TPS127 171.221,5.949 r90 top
TP19 "Test Point" TPS127 162.465,5.949 r90 top
TP20 "Test Point" TPS127 115.55,67.2 r90 top
WASHER5 "Custom 3D printed" Keystone_7687 -6.658,12.438 r0 top
WASHER6 "Custom 3D printed" Keystone_7687 -6.658,32.438 r0 top
WASHER7 "Custom 3D printed" Keystone_7687 -6.658,52.438 r0 top
WASHER8 "Custom 3D printed" Keystone_7687 -6.658,72.438 r0 top

## Footprints (in the part's own frame and the unit in brackets; to place one, negate y for a bottom-side part, rotate by r counter-clockwise, add the part's x,y. Pads: shape width x height; smd on the part's side, far side on the other; paste and mask are expansions set on the pad)
3M_N2530-6002RB [mm] "30 Contacts - Straight .100\" x .100\" Low Profile Four-Wall Header"
  oval 1.4x1.7 hole 1: 1(-17.78,-1.27) 2(-17.78,1.27) 3(-15.24,-1.27) 4(-15.24,1.27) 5(-12.7,-1.27) 6(-12.7,1.27) 7(-10.16,-1.27) 8(-10.16,1.27) 9(-7.62,-1.27) 10(-7.62,1.27) 11(-5.08,-1.27) 12(-5.08,1.27) 13(-2.54,-1.27) 14(-2.54,1.27) 15(0,-1.27) 16(0,1.27) 17(2.54,-1.27) 18(2.54,1.27) 19(5.08,-1.27) 20(5.08,1.27) 21(7.62,-1.27) 22(7.62,1.27) 23(10.16,-1.27) 24(10.16,1.27) 25(12.7,-1.27) 26(12.7,1.27) 27(15.24,-1.27) 28(15.24,1.27) 29(17.78,-1.27) 30(17.78,1.27)
  silkscreen extent -22.71,-4.85 22.71,4.52, body extent -22.71,-4.11 22.71,4.52, height 9.91
9774120360 [mm] "SMT Steel Spacer with internal Thread M3, height 12mm"
  round 7.4 / inner round 0 / far side round 0 hole 4.4 unplated: 1(0,0)
  body extent -3,-3 3,3, height 12
61300621121 [mm]
  rrect50% 1.4x1.7 hole 1: 1(-2.54,-1.27)
  oval 1.4x1.7 hole 1: 2(-2.54,1.27) 3(0,-1.27) 4(0,1.27) 5(2.54,-1.27) 6(2.54,1.27)
  silkscreen extent -4.54,-2.62 3.96,2.62, body extent -3.81,-2.54 3.81,2.54, height 8.59
61302621121 [mm]
  rrect50% 1.4x1.7 hole 1: 1(-15.24,-1.27)
  oval 1.4x1.7 hole 1: 2(-15.24,1.27) 3(-12.7,-1.27) 4(-12.7,1.27) 5(-10.16,-1.27) 6(-10.16,1.27) 7(-7.62,-1.27) 8(-7.62,1.27) 9(-5.08,-1.27) 10(-5.08,1.27) 11(-2.54,-1.27) 12(-2.54,1.27) 13(0,-1.27) 14(0,1.27) 15(2.54,-1.27) 16(2.54,1.27) 17(5.08,-1.27) 18(5.08,1.27) 19(7.62,-1.27) 20(7.62,1.27) 21(10.16,-1.27) 22(10.16,1.27) 23(12.7,-1.27) 24(12.7,1.27) 25(15.24,-1.27) 26(15.24,1.27)
  silkscreen extent -17.24,-2.62 16.66,2.62, body extent -16.51,-2.54 16.51,2.54, height 8.59
AMPHENOL_10052825-101LF [mm] "72 Contacts, 2mm Pitch, 6 Columns, 4 Pairs per Column, 4 Walls, Right Angle Header"
  round 1.1 hole 0.5: A1(-5,-7.65) A2(-3,-7.75) A3(-1,-7.65) A4(1,-7.75) A5(3,-7.65) A6(5,-7.75) B1(-5,-6.25) B2(-3,-6.35) B3(-1,-6.25) B4(1,-6.35) B5(3,-6.25) B6(5,-6.35) C1(-5,-4.85) C2(-3,-4.95) C3(-1,-4.85) C4(1,-4.95) C5(3,-4.85) C6(5,-4.95) D1(-5,-3.45) D2(-3,-3.55) D3(-1,-3.45) D4(1,-3.55) D5(3,-3.45) D6(5,-3.55) E1(-5,-2.05) E2(-3,-2.15) E3(-1,-2.05) E4(1,-2.15) E5(3,-2.05) E6(5,-2.15) F1(-5,-0.65) F2(-3,-0.75) F3(-1,-0.65) F4(1,-0.75) F5(3,-0.65) F6(5,-0.75) G1(-5,0.75) G2(-3,0.65) G3(-1,0.75) G4(1,0.65) G5(3,0.75) G6(5,0.65) H1(-5,2.15) H2(-3,2.05) H3(-1,2.15) H4(1,2.05) H5(3,2.15) H6(5,2.05) I1(-5,3.55) I2(-3,3.45) I3(-1,3.55) I4(1,3.45) I5(3,3.55) I6(5,3.45) J1(-5,4.95) J2(-3,4.85) J3(-1,4.95) J4(1,4.85) J5(3,4.95) J6(5,4.85) K1(-5,6.35) K2(-3,6.25) K3(-1,6.35) K4(1,6.25) K5(3,6.35) K6(5,6.25) L1(-5,7.75) L2(-3,7.65) L3(-1,7.75) L4(1,7.65) L5(3,7.75) L6(5,7.65)
  silkscreen extent -6.95,-9.4 6.95,11.85, body extent -6.95,-21.95 6.95,11.85, height 15.25
AMPHENOL_10052838-101LF [mm] "96 Contacts, 2mm Pitch, 8 Columns, 4 Pairs per Column, 4 Walls, Right Angle Header"
  round 1.1 hole 0.5: A1(-7,-7.65) A2(-5,-7.75) A3(-3,-7.65) A4(-1,-7.75) A5(1,-7.65) A6(3,-7.75) A7(5,-7.65) A8(7,-7.75) B1(-7,-6.25) B2(-5,-6.35) B3(-3,-6.25) B4(-1,-6.35) B5(1,-6.25) B6(3,-6.35) B7(5,-6.25) B8(7,-6.35) C1(-7,-4.85) C2(-5,-4.95) C3(-3,-4.85) C4(-1,-4.95) C5(1,-4.85) C6(3,-4.95) C7(5,-4.85) C8(7,-4.95) D1(-7,-3.45) D2(-5,-3.55) D3(-3,-3.45) D4(-1,-3.55) D5(1,-3.45) D6(3,-3.55) D7(5,-3.45) D8(7,-3.55) E1(-7,-2.05) E2(-5,-2.15) E3(-3,-2.05) E4(-1,-2.15) E5(1,-2.05) E6(3,-2.15) E7(5,-2.05) E8(7,-2.15) F1(-7,-0.65) F2(-5,-0.75) F3(-3,-0.65) F4(-1,-0.75) F5(1,-0.65) F6(3,-0.75) F7(5,-0.65) F8(7,-0.75) G1(-7,0.75) G2(-5,0.65) G3(-3,0.75) G4(-1,0.65) G5(1,0.75) G6(3,0.65) G7(5,0.75) G8(7,0.65) H1(-7,2.15) H2(-5,2.05) H3(-3,2.15) H4(-1,2.05) H5(1,2.15) H6(3,2.05) H7(5,2.15) H8(7,2.05) I1(-7,3.55) I2(-5,3.45) I3(-3,3.55) I4(-1,3.45) I5(1,3.55) I6(3,3.45) I7(5,3.55) I8(7,3.45) J1(-7,4.95) J2(-5,4.85) J3(-3,4.95) J4(-1,4.85) J5(1,4.95) J6(3,4.85) J7(5,4.95) J8(7,4.85) K1(-7,6.35) K2(-5,6.25) K3(-3,6.35) K4(-1,6.25) K5(1,6.35) K6(3,6.25) K7(5,6.35) K8(7,6.25) L1(-7,7.75) L2(-5,7.65) L3(-3,7.75) L4(-1,7.65) L5(1,7.75) L6(3,7.65) L7(5,7.75) L8(7,7.65)
  silkscreen extent -8.95,-9.4 8.95,11.85, body extent -8.95,-21.95 8.95,11.85, height 15.25
c600h270 [mm] "Plated Through Hole: Hole Dia.=2.7mm Pad Dia.=6.0mm"
  round 6 hole 2.7: 1(0,0)
CAPC1005X55N [mm] "Capacitor, Non-Polarized, Chip; 1.00mm L X 0.50mm W X 0.70mm H, IPC Medium Density"
  rect 0.62x0.62 smd: 1(-0.45,0) 2(0.45,0)
  body extent -0.52,-0.27 0.53,0.28, height 0.55
CAPC1608X87N [mm] "Chip Capacitor, Body 1.6x0.8mm IPC Medium Density"
  rect 0.95x1 smd: 1(-0.8,0) 2(0.8,0)
  body extent -0.87,-0.47 0.88,0.48, height 0.87
CAPC2012X90N [mm] "Chip Capacitor, Body 2.0x1.25mm, IPC Medium Density"
  rect 1.1x1.45 smd: 1(-0.9,0) 2(0.9,0)
  silkscreen extent 0,-0.58 0,0.58, body extent -1.05,-0.67 1.05,0.68, height 0.9
CAPC2012X95N [mm] "Chip Capacitor, Body 2.0x1.25mm, IPC Medium Density"
  rect 1.1x1.45 smd: 1(-0.9,0) 2(0.9,0)
  silkscreen extent 0,-0.58 0,0.58, body extent -1.05,-0.67 1.05,0.68, height 0.95
CAPC2012X135N [mm] "Chip Capacitor, Body 2.0x1.25mm, IPC Medium Density"
  rect 1.05x1.4 smd: 1(-0.9,0) 2(0.9,0)
  silkscreen extent 0,-0.58 0,0.58, body extent -1.05,-0.67 1.05,0.68, height 1.25
CAPC2013X100N [mm] "Capacitor, Non-Polarized, Chip; 2.00mm L X 1.25mm W X 0.9mm H, IPC Medium Density"
  rect 1.15x1.45 smd: 1(-0.9,0) 2(0.9,0)
  silkscreen extent 0,-0.63 0,0.63, body extent -1.1,-0.72 1.1,0.73, height 1
CAPMP3216X180N [mm] "Capacitor, Polarized, Molded  Body 3.2x1.6mm, IPC Medium Density"
  rect 1.8x1.25 smd: 1(-1.3,0) 2(1.3,0)
  silkscreen extent -2.4,-0.7 0,1.25, body extent -1.7,-0.9 1.7,0.9, height 1.6
CC6-1212DF-E [mm]
  round 2 hole 1: 1(-2.54,-2.63) 2(-2.54,-12.79) 3(-2.54,-17.87) 4(20.32,-17.87) 5(20.32,-12.79) 6(20.32,-7.71) 7(20.32,-2.63)
  round 2.5 hole 1.5: 8(0,0) 9(17.78,-20.5)
  silkscreen extent -4.06,-20.83 20.44,0.25, body extent -2.72,-20.81 20.44,0.29, height 8.4
CLIP_HOLLAND-SHIELDING_LC [mm]
  rect 9.4x2.3 smd: 1(0,0)
  silkscreen extent -4.7,-1.5 4.7,1.5, body extent -4.4,-1.15 4.4,1.15, height 3.5
DELOCK_65848 [mm] "50 Ohm Through Hole SMA Right Angle PCB Jack"
  round 2.1 hole 1.4: 1(0,0)
  round 2.2 hole 1.5: 2(-2.54,2.54) 2(-2.54,-2.54) 2(2.54,2.54) 2(2.54,-2.54)
  silkscreen extent -3.15,-5.1 19.1,4, body extent -3,-3.13 19,3.13, height 9.15
DIOM5336X265N [mm] "DO-214-AA/SMB Diode, Molded Body; 5.34mm L X 3.625mm W X 2.65mm H, IPC Medium Density"
  rect 2.3x2.15 smd: 1(-2.15,0) 2(2.15,0)
  silkscreen extent -3.92,-1.8 2.65,1.8, body extent -2.7,-1.95 2.7,1.95, height 2.4
FIDUCIAL_TOP_C100-200 [mm] "Round Fiducial Target, Top Layer, 1.0mm, Top Solder 2.0mm, Keepout =2.0mm"
  round 1 smd paste-0.51 mask+0.5: FTG2(0,0)
  L1 keep-out circle w0.1: c0,0 r1
FIDUCIAL_TOP_S100-200 [mm] "Square Fiducial Target, Top Layer, 1.0mm, Top Solder 2.0mm, Keepout =2.0mm"
  rect 1x1 smd rot 45 paste-0.51 mask+0.5: 1(0,0)
  L1 keep-out region: 1.414,0 0,-1.414 -1.414,0 0,1.414
FIL_MURATA_BNX02 [mm] "Block Type EMIFIL LC Combined Type, BNX02* Series"
  rect 3.8x2.5 smd: 1(-6.85,2.1) 2(6.85,2.1) 3(-6.85,-2.2) 4(6.85,-2.2)
  rect 7.9x2.3 smd: 4(1,-5.1)
  rect 3.4x2.3 smd: 4(3.25,5.1)
  silkscreen extent -5.95,-4.45 7.77,5.05, body extent -6.05,-4.55 6.05,4.55, height 3.1
FXMA2102UMX [mm]
  rect 0.55x0.25 smd: 1(-0.53,0)
  rect 0.25x0.45 smd: 2(-0.4,-0.475) 3(0,-0.475) 4(0.4,-0.475) 6(0.4,0.475) 7(0,0.475) 8(-0.4,0.475)
  rect 0.45x0.25 smd: 5(0.58,0)
  silkscreen extent -1.1,-0.05 -1,0.05, body extent -0.71,-0.61 0.71,0.61, height 0.5
IND_MURATA-PS_8400 [mm] "Miniature Surface Mount Power Inductors, 4.5mm L X 3.3mm W X 2.9mm H, MURATA 8400 Series"
  rect 2x3.5 smd: 1(-1.6,0) 2(1.6,0)
  silkscreen extent -0.3,-1.8 0.3,1.8, body extent -2.4,-1.8 2.4,1.8, height 2.9
IND_WURTH_WE-SL2 [mm] "Common Mode SMD Line Filter WE-SL2"
  rect 2x1.2 smd: 1(-3.75,1.27) 2(-3.75,-1.27) 3(3.75,-1.27) 4(3.75,1.27)
  silkscreen extent -4.75,-3.15 4.75,3.15, body extent -4.75,-3.15 4.75,3.15, height 5.3
Keystone_7687 [mm] "Polyphenylene Sulfide PPS Shoulder Washer"
  silkscreen extent -0.8,-5.6 0.8,5.6
LCCS127P500X500X145-8N [mm]
  rect 1.85x0.7 smd: 1(-2.2,1.27) 2(-2.2,0) 3(-2.2,-1.27) 5(2.2,-1.27) 6(2.2,0) 7(2.2,1.27)
  rect 0.7x1.85 smd: 4(0,-2.2)
  rect 0.7x2.5 smd: 8(0,1.75)
  silkscreen extent -3.8,-2.6 2.6,2.6, body extent -2.63,-2.63 2.63,2.63, height 1.55
LED_AVAGO_HSME-C120 [mm] "Green Chip LED, 2-Leads, Body 1.7x1.1mm, Side Emitting Package"
  rect 0.8x0.7 smd: 1(-1,0) 2(1,0)
  rect 0.4x0.4 smd: 3(0,-0.35)
  silkscreen extent -1.12,-0.92 0.42,0.8, body extent -0.85,-0.3 0.85,0.8, height 0.7
LED_DIALIGHT_571-0112F [mm] "2x 2mm LED (Top: Red, Bot: Green) PCB Edge Mounting (Without positioning pins) DIALIGHT 571 Serie"
  round 1.7 hole 1: 1(0,0) 2(2.54,0) 3(5.08,0) 4(7.62,0)
  silkscreen extent -6.55,-1.24 8.89,1.24, body extent -6.55,-1.24 8.89,1.24, height 8.61
LED_KINGBRIGHT_KPH-1608CGCK [mm] "SMT Green LED, Case 0603, Body L 1.6 x W 0.8mm H 0.65mm"
  rect 0.8x0.8 smd: 1(-0.825,0) 2(0.825,0)
  silkscreen extent -1.82,-0.4 0.08,0.4, body extent -0.8,-0.4 0.8,0.4, height 0.65
LT-DD-8_V [mm] "SON, 8-Leads, Body 3x3mm, Pitch 0.5mm, Thermal Pad 1.65x2.38 mm, IPC Low Density"
  rect 0.7x0.25 smd mask+0.15: 1(-1.4,0.75) 2(-1.4,0.25) 3(-1.4,-0.25) 4(-1.4,-0.75) 5(1.4,-0.75) 6(1.4,-0.25) 7(1.4,0.25) 8(1.4,0.75)
  rect 1.65x2.38 smd mask+0.2: 9(0,0)
  silkscreen extent -2,-1.55 1.55,1.6, body extent -1.5,-1.5 1.5,1.5, height 0.8
MOLEX_39-30-0040 [mm] "4.20mm (.165\") Pitch Mini-Fit Jr. Header, Dual Row, Right Angle with Snap-in Plastic Peg PCB Lock, 4 Circuits"
  round 2.5 hole 1.8: 1(-2.1,2.75) 2(2.1,2.75) 3(-2.1,-2.75) 4(2.1,-2.75)
  round 4 hole 3 unplated mask+1: 5(0,10.05)
  silkscreen extent -5.2,-1.24 4.8,16.63, body extent -5.2,-3.28 4.8,16.65, height 11.4
MTG300_600 [mm] "Plated Through Hole: Hole Dia.=3.0mm Pad Dia.=6.0mm"
  round 6 / inner round 4.5 / far side round 6 hole 3: MH(0,0)
PTH-M3.4x6.0_BTKO [mm]
  round 6 hole 3.4: 1(0,0)
  L4 keep-out region: -5,-3.05 -5,7.3 5,7.3 5,-3.05 1.173,-3.05 1.173,-3.056 2.504,-2.108 3.211,-0.635 3.118,0.997 2.247,2.38 0.817,3.169 -0.817,3.169 -2.247,2.38 -3.118,0.997 -3.211,-0.635 -2.504,-2.108 -1.173,-3.056 -1.173,-3.056 -1.173,-3.05
QFN50P700X800X80_HS-53M [mm]
  oval 1.05x0.25 smd: 1(-3.425,3.25) 2(-3.425,2.75) 3(-3.425,2.25) 4(-3.425,1.75) 5(-3.425,1.25) 6(-3.425,0.75) 7(-3.425,0.25) 8(-3.425,-0.25) 9(-3.425,-0.75) 10(-3.425,-1.25) 11(-3.425,-1.75) 12(-3.425,-2.25) 13(-3.425,-2.75) 14(-3.425,-3.25) 27(3.425,-3.25) 28(3.425,-2.75) 29(3.425,-2.25) 30(3.425,-1.75) 31(3.425,-1.25) 32(3.425,-0.75) 33(3.425,-0.25) 34(3.425,0.25) 35(3.425,0.75) 36(3.425,1.25) 37(3.425,1.75) 38(3.425,2.25) 39(3.425,2.75) 40(3.425,3.25)
  oval 0.25x1.05 smd: 15(-2.75,-3.925) 16(-2.25,-3.925) 17(-1.75,-3.925) 18(-1.25,-3.925) 19(-0.75,-3.925) 20(-0.25,-3.925) 21(0.25,-3.925) 22(0.75,-3.925) 23(1.25,-3.925) 24(1.75,-3.925) 25(2.25,-3.925) 26(2.75,-3.925) 41(2.75,3.925) 42(2.25,3.925) 43(1.75,3.925) 44(1.25,3.925) 45(0.75,3.925) 46(0.25,3.925) 47(-0.25,3.925) 48(-0.75,3.925) 49(-1.25,3.925) 50(-1.75,3.925) 51(-2.25,3.925) 52(-2.75,3.925)
  rect 5.41x6.4 smd: 53(0,0)
  silkscreen extent -4.47,-4.2 3.7,4.2, body extent -3.55,-4.05 3.55,4.05, height 0.8
RESC1005X40N [mm]
  rect 0.58x0.62 smd: 1(-0.47,0) 2(0.47,0)
  body extent -0.52,-0.27 0.53,0.28, height 0.4
RESC1608X55N [mm] "Chip Resistor, EIA 0603, Metric 1608, Body 1.6x0.8mm, IPC Medium Density"
  rect 0.9x1 smd: 1(-0.8,0) 2(0.8,0)
  body extent -0.87,-0.47 0.88,0.48, height 0.55
RESC2012X60N [mm] "Chip Resistor, EIA 0805, Metric 2012, Body 2.0x1.2mm, IPC Medium Density"
  rect 0.95x1.4 smd: 1(-1,0) 2(1,0)
  silkscreen extent 0,-0.55 0,0.55, body extent -1.1,-0.67 1.1,0.68, height 0.6
RESC2113X55N [mm] "Chip Resistor, EIA 0805, Metric 2113, Body 2.05x1.3mm, IPC Medium Density"
  rect 1x1.45 smd: 1(-0.95,0) 2(0.95,0)
  silkscreen extent 0,-0.55 0,0.55, body extent -1,-0.62 1,0.63, height 0.55
RESC6331X70N [mm] "Chip Resistor, EIA 2512, Metric 6331, 2-Leads, Body 6.3x3.1mm, IPC Medium Density"
  rect 1.05x3.3 smd: 1(-3.1,0) 2(3.1,0)
  silkscreen extent -2.2,-1.65 2.2,1.65, body extent -3.25,-1.65 3.25,1.65, height 0.7
SOD-523F [mm] "Small Outline Diode Flat Lead (SOD-523F), Body; 1.80mm L X 1mm W X 0.85mm H"
  rect 0.6x0.8 smd: 1(-0.85,0) 2(0.85,0)
  silkscreen extent -1.8,-0.5 0.2,0.5, body extent -0.91,-0.5 0.89,0.5, height 0.85
SODFL2512X100N [mm] "SODFL Diode; 1.70mm W X 1.25mm L X 1.00mm H body, IPC Medium Density"
  rect 0.84x0.46 smd: 1(-1.14,0) 2(1.14,0)
  silkscreen extent -1.47,-0.65 0.85,0.86, body extent -1.35,-0.65 1.35,0.65, height 1
SOIC127P600X175-8N [mm] "SOIC 8, Pitch 1.27mm - Body 4x5mm, IPC Medium Density"
  rect 1.55x0.6 smd: 1(-2.7,1.905) 2(-2.7,0.635) 3(-2.7,-0.635) 4(-2.7,-1.905) 5(2.7,-1.905) 6(2.7,-0.635) 7(2.7,0.635) 8(2.7,1.905)
  silkscreen extent -1.55,-2.5 1.55,2.5, body extent -3.1,-2.5 3.1,2.5, height 1.75
SOIC127P1030X265-16N [mm] "SOIC, 1.27mm Pitch; 16 Pin, 7.50mm W X 10.3mm L X 2.65mm H body, IPC Medium Density"
  rect 2x0.6 smd: 1(-4.65,4.445) 2(-4.65,3.175) 3(-4.65,1.905) 4(-4.65,0.635) 5(-4.65,-0.635) 6(-4.65,-1.905) 7(-4.65,-3.175) 8(-4.65,-4.445) 9(4.65,-4.445) 10(4.65,-3.175) 11(4.65,-1.905) 12(4.65,-0.635) 13(4.65,0.635) 14(4.65,1.905) 15(4.65,3.175) 16(4.65,4.445)
  silkscreen extent -5.52,-5.15 3.32,5.36, body extent -5.18,-5.25 5.18,5.25, height 1.68
SON50P160X65_HS-7N [mm] "SON, 6-Leads, Body 1,60x1,60mm, Pitch 0,50mm, Thermal Pad 1,18x0,28mm, IPC Medium Density"
  rect 0.63x0.3 smd: 1(-0.76,0.5) 2(-0.76,0) 3(-0.76,-0.5) 4(0.76,-0.5) 5(0.76,0) 6(0.76,0.5)
  rect 0.45x1.3 smd: 7(0,0)
  silkscreen extent -1.28,-0.98 0.85,1.02, body extent -0.85,-0.85 0.85,0.85, height 0.65
SON50P200X300X80-11N-R94X250 [mm] "SON, 10-Leads, Body 2x3mm, Pitch 0.5mm, Thermal Pad 0.94x2.5mm, IPC Medium Density"
  rect 0.7x0.3 smd: 1(-1.05,1) 2(-1.05,0.5) 3(-1.05,0) 4(-1.05,-0.5) 5(-1.05,-1) 6(1.05,-1) 7(1.05,-0.5) 8(1.05,0) 9(1.05,0.5) 10(1.05,1)
  rect 0.94x2.5 smd: 11(0,0)
  silkscreen extent -1.5,-1.55 1.05,1.6, body extent -1.05,-1.55 1.05,1.55, height 0.8
SOP50P310X90-8N [mm] "SOP, 0.50mm pitch; 8 pin, 2.30mm W X 2.00mm L X 0.90mm H body, PC Medium Density"
  rect 0.85x0.3 smd: 1(-1.55,0.75) 2(-1.55,0.25) 3(-1.55,-0.25) 4(-1.55,-0.75) 5(1.55,-0.75) 6(1.55,-0.25) 7(1.55,0.25) 8(1.55,0.75)
  silkscreen extent -1.83,-1 0.8,1.52, body extent -1.62,-1 1.62,1, height 0.9
SOP50P490X110-10N [mm] "MSOP, 10-Leads, Body 3.1x3.1mm (max), Pitch 0.50mm, IPC Medium Density"
  rect 1.5x0.3 smd: 1(-2.2,1) 2(-2.2,0.5) 3(-2.2,0) 4(-2.2,-0.5) 5(-2.2,-1) 6(2.2,-1) 7(2.2,-0.5) 8(2.2,0) 9(2.2,0.5) 10(2.2,1)
  silkscreen extent -2.82,-1.5 1.12,1.77, body extent -2.45,-1.55 2.45,1.55, height 1.1
SOP65P490X110-8N [mm]
  rect 1.5x0.45 smd: 1(-2.2,0.975) 2(-2.2,0.325) 3(-2.2,-0.325) 4(-2.2,-0.975) 5(2.2,-0.975) 6(2.2,-0.325) 7(2.2,0.325) 8(2.2,0.975)
  silkscreen extent -2.82,-1.5 1.12,1.82, body extent -2.45,-1.55 2.45,1.55, height 1.1
SOP65P640X120-16N [mm] "SOP, 0.65mm pitch; 16 pin, 4.40mm W X 5.00mm L X 1.20mm H body IPC Medium Density"
  rect 1.45x0.45 smd: 1(-2.95,2.275) 2(-2.95,1.625) 3(-2.95,0.975) 4(-2.95,0.325) 5(-2.95,-0.325) 6(-2.95,-0.975) 7(-2.95,-1.625) 8(-2.95,-2.275) 9(2.95,-2.275) 10(2.95,-1.625) 11(2.95,-0.975) 12(2.95,-0.325) 13(2.95,0.325) 14(2.95,0.975) 15(2.95,1.625) 16(2.95,2.275)
  silkscreen extent -3.07,-2.55 1.85,3.17, body extent -3.12,-2.55 3.12,2.55, height 1.2
SOT95P240X110-3N [mm] "SOT23 3-Leads, Pitch 0.95mm, Body 1.3x2.9mm, IPC Medium Density"
  rect 1.05x0.65 smd: 1(-1.15,0.95) 2(-1.15,-0.95) 3(1.15,0)
  silkscreen extent -1.52,-1.45 0.3,1.92, body extent -1.25,-1.5 1.25,1.5, height 1.1
SOT95P280X100-5N [mm] "SOT23, 0.95mm pitch; 5 pin, 1.625mm W X 2.9mm L, IPC Medium Density"
  rect 1.1x0.55 smd: 1(-1.35,0.95) 2(-1.35,0) 3(-1.35,-0.95) 4(1.35,-0.95) 5(1.35,0.95)
  silkscreen extent -1.78,-1.45 0.48,1.87, body extent -1.4,-1.5 1.4,1.5, height 1
SOT95P280X145-5N [mm] "SOT, 0.95mm pitch; 5 pin, 1.60mm W X 2.90mm L X 1.45mm H body, IPC Medium Density"
  rect 1.1x0.6 smd: 1(-1.3,0.95) 2(-1.3,0) 3(-1.3,-0.95) 4(1.3,-0.95) 5(1.3,0.95)
  silkscreen extent -1.72,-1.45 0.43,1.87, body extent -1.4,-1.5 1.4,1.5, height 1.45
SOT95P280X145-6N [mm] "SOT23, 6-Leads, Body 1.6x3.0mm, Pitch 0.95mm, IPC Medium Density"
  rect 1.05x0.6 smd: 1(-1.35,0.95) 2(-1.35,0) 3(-1.35,-0.95) 4(1.35,-0.95) 5(1.35,0) 6(1.35,0.95)
  silkscreen extent -1.77,-1.55 0.45,1.92, body extent -1.4,-1.5 1.4,1.5, height 1.45
SOTFL50P160X60-6N [mm]
  rect 0.475x0.3 smd: 1(-0.838,0.5) 2(-0.838,0) 3(-0.838,-0.5) 4(0.838,-0.5) 5(0.838,0) 6(0.838,0.5)
  silkscreen extent -1.07,-0.8 0.25,0.9, body extent -0.8,-0.8 0.8,0.8, height 0.6
SW_CTS_204-121ST [mm] "Body 7.26 x 9.78mm SPDT DIP Switch, 204 Series"
  rect 2.44x1.13 smd: 1(-4.3,1.27) 2(-4.3,-1.27) 3(4.3,-1.27) 4(4.3,1.27)
  silkscreen extent -6.25,-3.63 4.89,3.63, body extent -5.2,-3.63 5.2,3.63, height 9.76
TOSHIBA_11-4M1S [mm] "SOIC,1.27mm Pitch; 4 pin, TOSHIBA Case (5mm Creepage)"
  rect 1.2x0.8 smd: 1(-3.15,1.27) 3(-3.15,-1.27) 4(3.15,-1.27) 6(3.15,1.27)
  silkscreen extent -3.25,-1.98 2.15,2.4, body extent -3.7,-1.97 3.7,1.98, height 2.3
TPS127 [mm] "1.27 x  1.27mm SMD Test Point Area"
  rect 1.27x1.27 smd paste-1.27: 1(0,0)
  silkscreen extent -0.94,-0.94 0.94,0.94

## Part data
C1A C1B C1C C1D C1E C1F C1G C1H C5A C5B C5C C5D C5E C5F C5G C5H T_C12: library part CC0603_18PF_50V_5%_NP0, "Non-polarised capacitor", Case=0603, Manufacturer=GENERIC, Manufacturer1 ComponentHeight=0.87mm, Manufacturer1 Example=PHYCOMP, Manufacturer1 Part Number=223886715189, Tolerance=±5%, Voltage=50V, Author="CERN DEM JLC", Component Type=Standard, CreateDate=03.12.2007, HelpURL=\\cern.ch\dfs\Applications\Altium\Datasheets\CC0603_NP0_PHYCOMP.pdf, LatestRevisionDate=03.12.2007, Manufacturer Part Number=CC0603_18PF_50V_5%_NP0, Mounted=Yes, Part Description="SMD Multilayer Chip Ceramic Capacitor", Part Number=CC0603_18PF_50V_5%_NP0, Pin Count=2, Sense=No, SMD=Yes, Socket=No, Status=Preferred, TC=C0G/NP0
C2A C2B C2C C2D C2E C2F C2G C2H: library part CC0805_82PF_100V_1%_NP0_AVX_08051A820FAT2A, "Non-polarised capacitor", Case=0805, Manufacturer=AVX, Manufacturer Part Number=08051A820FAT2A, Tolerance=±1%, Voltage=100V, Author="CERN DEM WB", ComponentHeight=0.9mm, Component Type=Standard, CreateDate=26.07.2016, HelpURL=\\cern.ch\dfs\Applications\Altium\Datasheets\CC0805_C0G_AVX.pdf, LatestRevisionDate=26.07.2016, Mounted=Yes, Part Description="SMD Multilayer Chip Ceramic Capacitor", Part Number=CC0805_82PF_100V_1%_NP0_AVX_08051A820FAT2A, Pin Count=2, Sense=No, SMD=Yes, Socket=No, Status="Not Recommended", TC=NP0